# Altium PCB CH32X035C-R0.PcbDoc
Units mil, origin at the board's own origin, x right, y up, seen from the top; angles counter-clockwise.
Board outline 2401.57 x 2047.24 mil, 2 copper layers (Top Layer, Bottom Layer); 40 components, 62 nets, 228 pads, 251 vias.
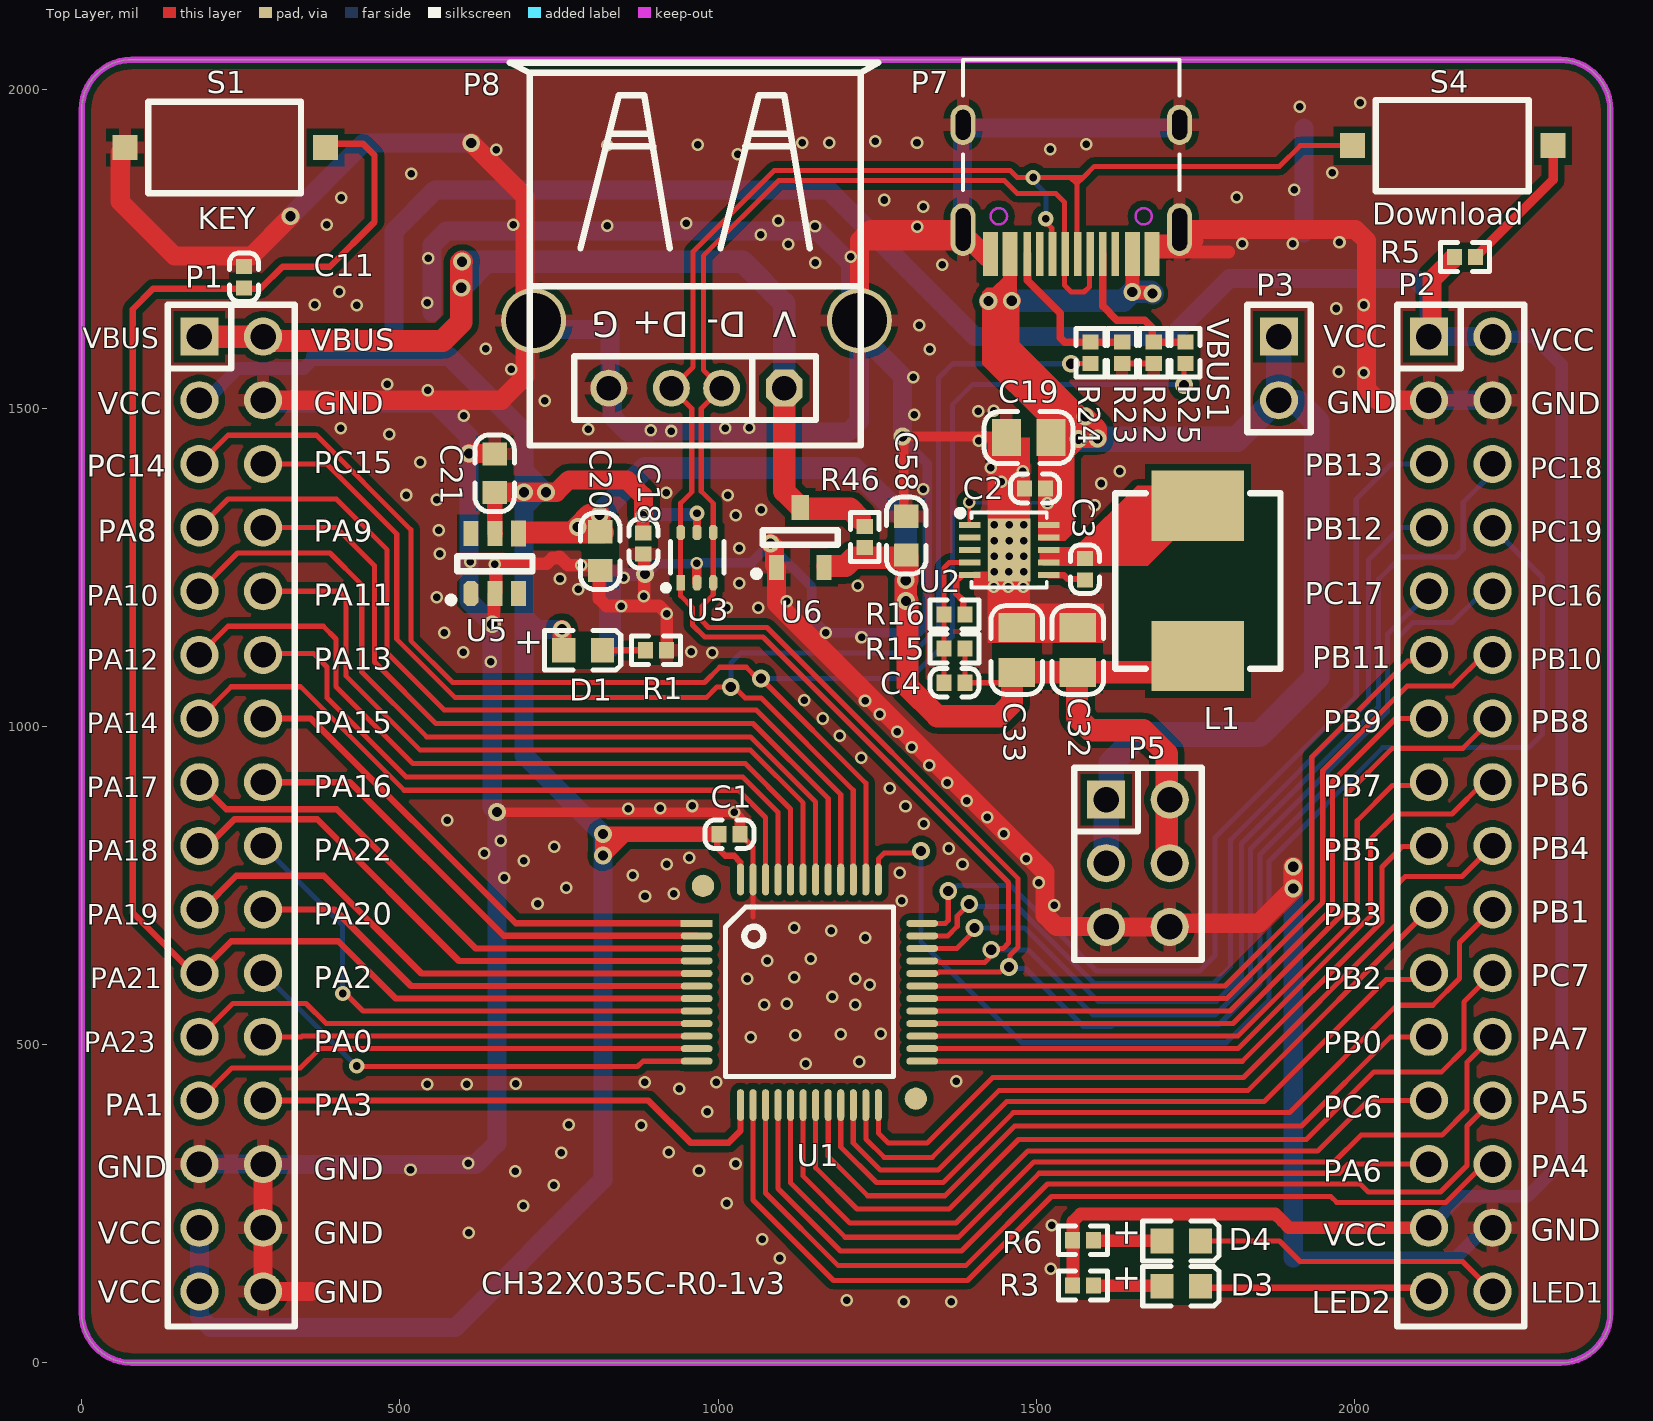
[diagram p0: Top Layer view]
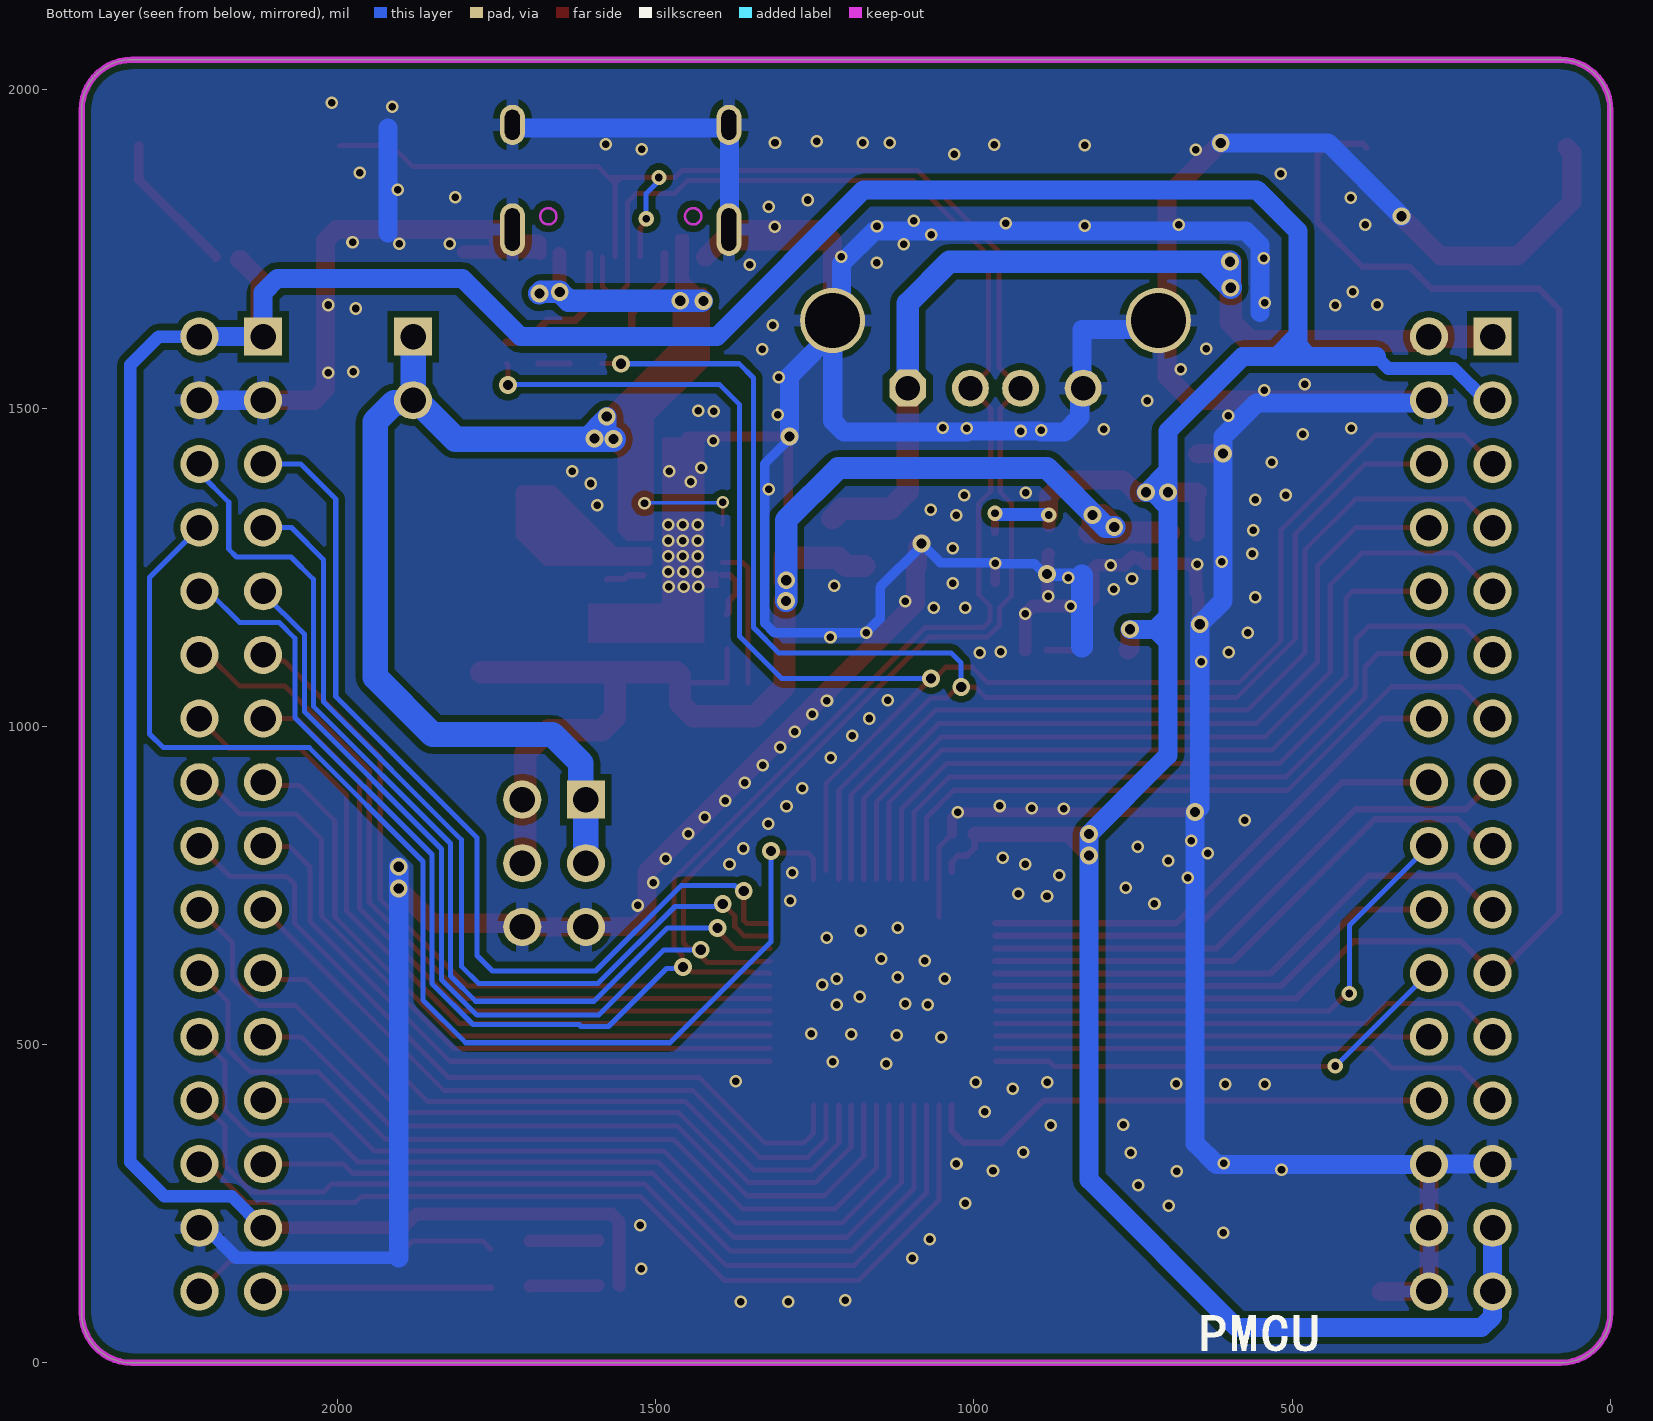
[diagram p1: Bottom Layer view, seen from below]

## Layer stack, top to bottom
Top Solder: solder mask 0.4, Solder Resist, Dk 3.5
Top Layer: signal copper 1.4
Dielectric1: dielectric 12.6, FR-4, Dk 4.8
Bottom Layer: signal copper 1.4
Bottom Solder: solder mask 0.4, Solder Resist, Dk 3.5

## Board outline
0,78.74 0,1968.5 cw(c78.74,1968.5) 78.74,2047.24 2322.84,2047.24 cw(c2322.84,1968.5) 2401.58,1968.5 2401.57,78.74 cw(c2322.83,78.74) 2322.84,0 78.74,0 cw(c78.74,78.74)

## Design rules (kind name [scope] priority, off if disabled: settings)
Clearance Clearance_1 [InPolygon] p1: gap=10 ignorepadtopadclearanceinfootprint=FALSE except(0: Arc-Hole Track-Hole SMDPad-Hole THPad-Hole Via-Hole Fill-Hole Poly-Hole Region-Hole Text-Hole)
Clearance [All] p2: gap=6 ignorepadtopadclearanceinfootprint=FALSE except(0: Arc-Hole Track-Hole SMDPad-Hole THPad-Hole Via-Hole Fill-Hole Poly-Hole Region-Hole Text-Hole)
ComponentClearance [All] p1 off: gap=10 collisioncheckmode=3 verticalgap=10 showdistances=FALSE
DiffPairsRouting [All] p1: maxlimit=10 minlimit=7 mostfreqgap=8 toplayer_minwidth=8 toplayer_maxwidth=15 toplayer_prefwidth=15 bottomlayer_minwidth=8 bottomlayer_maxwidth=15 bottomlayer_prefwidth=15 maxuncoupledlength=500
MinimumSolderMaskSliver [All] p1 off: minsoldermaskwidth=10
PolygonConnect PolygonConnect_1 [IsVia] p1: connectstyle=Direct reliefconductorwidth=10 reliefentries=4 polygonreliefangle="90 Angle" airgapwidth=10
PolygonConnect [All] p2: connectstyle=Relief reliefconductorwidth=20 reliefentries=4 polygonreliefangle="90 Angle" airgapwidth=10
RoutingVias [All] p1: holewidth=16 width=28 viastyle="Through Hole" minholewidth=11.81 minwidth=17.72 maxholewidth=20 maxwidth=32
SilkToSilkClearance [All] p1 off: silktosilkclearance=10
SilkToSolderMaskClearance [IsPad] p1 off: minsilkscreentomaskgap=10 clearancetoexposedcopper=TRUE
SolderMaskExpansion [All] p1: expansion=2 istentingtop=FALSE
Width [All] p1: maxlimit=100 minlimit=6 preferedwidth=10
25 further rules are at their usual default settings.

## Classes and differential pairs
differential pair NewDifferentialPair1: +PC16 -PC17

## Components (designator, comment, footprint, x,y, rotation, side; value= is the part's Value field where it differs from the comment)
C1 "0.1uF" 0402_C 1034.57,830.45 r270 top
C2 "NC(0.1uF)" 0402_C 1481.02,1373.79 r90 top
C3 "NC(100nF)" 0402_C 1576.2,1230.05 r180 top
C4 "NC(68pF)" 0402_C 1387.91,1068.48 r270 top
C11 "0.1uF" 0402_C 255,1722.24 r0 top
C18 "0.1uF" 0402_C 882.46,1270.58 r180 top
C19 "NC(22uF/35V)" 0805_C 1452.6,1453.61 r0 top
C20 "10uF" 0603_C 814.6,1244.87 r90 top
C21 "10uF" 0603_C 648.82,1427.95 r270 top
C32 "NC(22uF)" 0805_C 1564.9,1154.99 r270 top
C33 "NC(22uF)" 0805_C 1469.1,1154.99 r270 top
C58 "10uF" 0603_C 1295.47,1269.21 r90 top
D1 "RED" 0603+ 757.55,1119.65 r0 top
D3 "LED2" 0603+ 1697.11,120.47 r0 top
D4 "LED1" 0603+ 1697.11,191.47 r0 top
L1 "NC(4.7uH)" IND-SMD_L7.0-W6.6 1753.53,1228.43 r270 top
P1 "Header 16X2" IDC32-2.54mm 185,1612.24 r0 top
P2 "Header 16X2" IDC32-2.54mm 2116.58,1612.24 r0 top
P3 "HEADER 2" SIP2-2.54mm 1880.92,1612.24 r180 top
P5 "HEADER 3x2" IDC6-2.54mm 1609.43,884.87 r270 top
P7 "TYPE-C" TYPE-C-Receptacle-2.0 1554.72,1742.24 r180 top
P8 "USB_A" USBAF 1103.72,1531.24 r180 top
R1 "1K" 0402 885.61,1119.45 r0 top
R3 "1K" 0402 1556.4,121.6 r0 top
R5 "4.7K" 0402 2156.58,1737.24 r0 top
R6 "1K" 0402 1556.4,192.6 r0 top
R15 "NC(15K)" 0402 1354.45,1122.13 r0 top
R16 "NC(4.7K)" 0402 1387.91,1175.78 r180 top
R22 "5.1K" 0402 1684.41,1603.57 r270 top
R23 "5.1K" 0402 1634.59,1603.57 r270 top
R24 "0Ω" 0402 1584.78,1570.1 r90 top
R25 "0Ω" 0402 1734.23,1603.57 r270 top
R46 "NC(0Ω)" 0402 1230.25,1280.84 r90 top
S1 "KEY" SMD_6.1x3.65x2.5mm-KEY 383,1909.24 r180 top
S4 "Download" SMD_6.1x3.65x2.5mm-KEY 2311.58,1912.24 r180 top
U1 "CH32X035C8T6" LQFP48 966.15,690.45 r270 top
U2 "NC(CH2024Q)" DFN10_3X3 1457.18,1277.04 r270 top
U3 "CH412K" SOT-363 941.05,1225.61 r0 top
U5 "CH2003K" SOT-23-6 611.77,1208.49 r0 top
U6 "CH213" SOT-23-3 1091.55,1249.64 r0 top

## Footprints (in the part's own frame and the unit in brackets; to place one, negate y for a bottom-side part, rotate by r counter-clockwise, add the part's x,y. Pads: shape width x height; smd on the part's side, far side on the other; paste and mask are expansions set on the pad)
0402 [mm]
  rect 0.6x0.65 smd mask+0.051: 1(0,0) 2(0.85,0)
  silkscreen extent -0.55,-0.58 1.4,0.57
0402_C [mm]
  rect 0.65x0.6 smd mask+0.051: 1(0,0) 2(0,-0.85)
  silkscreen extent -0.58,-1.4 0.57,0.55
0603+ [mm]
  rect 0.93x0.98 smd: 1(0,0) 2(1.54,0)
  silkscreen extent -0.76,-0.79 2.27,0.79
0603_C [mm]
  rect 0.93x0.98 smd mask+0.051: 1(0,0) 2(1.54,0)
  silkscreen extent -0.76,-0.79 2.31,0.79
0805_C [mm]
  rect 1.16x1.47 smd mask+0.051: 1(0,0) 2(1.78,0)
  silkscreen extent -0.88,-1.04 2.66,1.03
DFN10_3X3 [mm]
  rect 2.5x1.7 smd mask+0.051: 0(0,0)
  rect 0.25x0.85 smd mask+0.051: 1(-1,-1.575) 2(-0.5,-1.575) 3(0,-1.575) 4(0.5,-1.575) 5(1,-1.575) 6(1,1.575) 7(0.5,1.575) 8(0,1.575) 9(-0.5,1.575) 10(-1,1.575)
  silkscreen extent -1.57,-2.05 1.5,1.5
IDC6-2.54mm [mil]
  rect 60x60 hole 40: 1(0,0)
  round 60 hole 40: 2(0,100) 3(100,0) 4(100,100) 5(200,0) 6(200,100)
  silkscreen extent -50,-50 252,150
IDC32-2.54mm [mil]
  rect 60x60 hole 40: 1(0,0)
  round 60 hole 40: 2(100,0) 3(0,-100) 4(100,-100) 5(0,-200) 6(100,-200) 7(0,-300) 8(100,-300) 9(0,-400) 10(100,-400) 11(0,-500) 12(100,-500) 13(0,-600) 14(100,-600) 15(0,-700) 16(100,-700) 17(0,-800) 18(100,-800) 19(0,-900) 20(100,-900) 21(0,-1000) 22(100,-1000) 23(0,-1100) 24(100,-1100) 25(0,-1200) 26(100,-1200) 27(0,-1300) 28(100,-1300) 29(0,-1400) 30(100,-1400) 31(0,-1500) 32(100,-1500)
  silkscreen extent -50,-1555 150,50
IND-SMD_L7.0-W6.6 [mm]
  rect 2.8x3.7 smd: 1(-3,0) 2(3,0)
  silkscreen extent -3.5,-3.3 3.5,3.3
LQFP48 [mm]
  round 0.889 smd: 0(-1.496,0.254) 0(6.996,8.746)
  rect 0.28x1.27 smd mask+0.051: 1(0,0)
  oval 0.28x1.27 smd mask+0.051: 2(0.5,0) 3(1,0) 4(1.5,0) 5(2,0) 6(2.5,0) 7(3,0) 8(3.5,0) 9(4,0) 10(4.5,0) 11(5,0) 12(5.5,0) 25(5.5,9) 26(5,9) 27(4.5,9) 28(4,9) 29(3.5,9) 30(3,9) 31(2.5,9) 32(2,9) 33(1.5,9) 34(1,9) 35(0.5,9) 36(0,9)
  oval 1.27x0.28 smd mask+0.051: 13(7.25,1.75) 14(7.25,2.25) 15(7.25,2.75) 16(7.25,3.25) 17(7.25,3.75) 18(7.25,4.25) 19(7.25,4.75) 20(7.25,5.25) 21(7.25,5.75) 22(7.25,6.25) 23(7.25,6.75) 24(7.25,7.25) 37(-1.75,7.25) 38(-1.75,6.75) 39(-1.75,6.25) 40(-1.75,5.75) 41(-1.75,5.25) 42(-1.75,4.75) 43(-1.75,4.25) 44(-1.75,3.75) 45(-1.75,3.25) 46(-1.75,2.75) 47(-1.75,2.25) 48(-1.75,1.75)
  silkscreen extent -0.65,1.15 6.11,7.86
SIP2-2.54mm [mil]
  rect 60x60 hole 40: 1(0,0)
  round 60 hole 40: 2(0,100)
  silkscreen extent -50,-50 50,150
SMD_6.1x3.65x2.5mm-KEY [mm]
  rect 1x1 smd: 1(0,0) 2(8,0)
  silkscreen extent 0.98,-1.83 7.08,1.83
SOT-23-3 [mm] "SOT-23-3"
  rect 0.6x1 smd: 1(0,0) 2(1.9,0)
  rect 0.7x1 smd: 3(0.95,2.4)
  silkscreen extent -0.93,-0.38 2.45,1.49
SOT-23-6 [mm] "SOT-23-6"
  oct 0.6x1 smd: 1(0,0)
  rect 0.6x1 smd: 2(0.95,0) 3(1.9,0) 5(0.95,2.4) 6(0,2.4)
  rect 0.6x1.04 smd: 4(1.9,2.4)
  silkscreen extent -0.93,-0.38 2.45,1.49
SOT-363 [mm]
  rect 0.35x0.6 smd mask+0.051: 1(0,0)
  oct 0.35x0.6 smd mask+0.051: 2(0.65,0) 3(1.3,0) 4(1.3,2) 5(0.65,2) 6(0,2)
  silkscreen extent -0.7,-0.31 1.73,1.65
TYPE-C-Receptacle-2.0 [mm]
  oval 1x2.1 hole 0.6 slot 1.7 at 90 deg: 0(-4.32,-0.97) 0(4.32,-0.97)
  oval 1x1.6 hole 0.6 slot 1.2 at 90 deg: 0(-4.32,-5.15) 0(4.32,-5.15)
  rect 0.6x1.75 smd mask+0.051: A1(-3.225,0) A4(-2.45,0) B1(3.225,0) B4(2.45,0)
  rect 0.3x1.75 smd mask+0.051: A5(-1.25,0) A6(-0.25,0) A7(0.25,0) A8(1.25,0) B5(1.75,0) B6(0.75,0) B7(-0.75,0) B8(-1.75,0)
  Keep-Out Layer circle w0.1: c2.89,-1.5 r0.325
  Keep-Out Layer circle w0.1: c-2.89,-1.5 r0.325
  silkscreen extent -4.32,-7.75 4.32,-2.55
USBAF [mm]
  round 2.6 hole 2.2: 0(-3,-2.7) 0(10,-2.7)
  oct 1.473x1.473 hole 0.965: 1(0,0)
  round 1.473 hole 0.965: 2(2.5,0) 3(4.5,0) 4(7,0)
  silkscreen extent -3.75,-12.99 10.95,2.29

## Part data
C1 C11 C18: library part Cap, "Capacitor"
C2 C20 C21 C58: library part CAP, "Capacitor"
C3: library part "0603 1uF (105) 10% 50V", "贴片电容", Package=0603, SuppliersPartNumber=C15849, ComponentLink1Description=供应商链接, ComponentLink1URL=http://www.szlcsc.com/product/details_16531.html, Supplier=LC
C4 C19 C32 C33: library part "0603 100nF (104) 10% 50V", "贴片电容", Package=0603, SuppliersPartNumber=C14663, ComponentLink1Description=供应商链接, ComponentLink1URL=http://www.szlcsc.com/product/details_15331.html, Supplier=LC
D1 D3 D4: library part LED0, "Typical INFRARED GaAs LED", LatestRevisionDate=08-Jul-2005, LatestRevisionNote="Mech Layer 1 removed.", PackageReference=LED-0, Published=8-Jun-2000, Publisher="Altium Limited"
  D1: PackageDescription="LED; 2 Leads"
L1: library part INDUCTOR
P1 P2: "Header, 16-Pin, Dual row", LatestRevisionDate=17-Jul-2002, LatestRevisionNote="Re-released for DXP Platform.", Publisher="Altium Limited"
P3: "Header, 2-Pin"
P5: "Header, 3-Pin, Dual row"
P7: library part TYPE-C1
P8: library part USB, "USB Port"
R1 R15 R16 R46: library part RES
R3 R6: library part "Res Semi", "Semiconductor Resistor"
R5 R22 R23 R24 R25: library part Res2, "Resistor"
S4: library part KEY1
U1: "RISC-V MCU with USB/PD/ADC/SPI/I2C/UART/OA/CMP"
U2: library part CH2024Q, "Step-Down DC-DC Converter, 28V input, FB 1.2V, 3A output"
U3: "Qaud ESD protect, high speed"
U5: "Step-Down DC-DC Converter, 5V input, FB 0.6V, 800mA output, with LDO 3.3V * 200mA"
U6: library part CH213E, "Ideal Diode 5V*1A"

## Via types
v1: diameter 19.68, hole 11.81, Top Layer to Bottom Layer, tented both sides, 207 vias
v2: diameter 28, hole 16, Top Layer to Bottom Layer, tented both sides, 38 vias
v3: diameter 24, hole 12, Top Layer to Bottom Layer, tented both sides, 6 vias

## Nets (pads, with @x,y where several pads share a name; then routed paths per layer and width w, separated by ;. In a path a pad name is that pad's centre, name@x,y a point inside that pad or via, vN(x,y) a via of type N, cw(c..) or ccw(c..) an arc to the next point about the centre after c; other vN are vias at no path point)
3V3: C1.2 C18.2 C21.2 D1.1 P1.3 P1.29 P1.31 P2.1 P2.2 P2.29 R3.1 R5.1 R6.1 U1.48 U3.5 U5.5 | length 8458.7
  Top Layer w10: C1.2@998.32,830.45 998.32,809.45 1011.32,796.45 1025.15,796.45 1034.85,786.75 1034.85,771.75 U1.48@1035.05,771.56
  Top Layer w13: U3.5 v3(966.64,1334.61)
  Top Layer w20: C18.2@881.69,1314.72 881.69,1331.28 v3(882.46,1332.04) ; R3.1 1557.58,122.78 1557.58,222.07 1569.3,233.79 1875.09,233.79 1886.26,222.62 1896.63,212.24 P2.29
  Top Layer w25: C21.2 648.99,1367.14 648.99,1303.16 U5.5 ; v2(818.79,830.92) v2(818.79,797.23) 819.6,797.23 852.82,830.45 ; v2@819.26,830.45 852.82,830.45 ; C1.2@997.69,830.45 852.82,830.45
  Top Layer w30: C21.2 649.2,1367.71 v2(695.08,1367.71) v2(729.59,1367.71) 745.74,1367.71 765.34,1387.31 856.6,1387.31 882.46,1361.46 v3(882.46,1332.04) ; v2(754.49,1152.43) 754.49,1122.71 D1.1 ; P2.1@2121.58,1601.68 2121.58,1702.24 2152.28,1732.95 R5.1@2153.27,1732.95
  Bottom Layer w20: P1.3 195.82,1512.24 245.81,1562.23 348.99,1562.23 367.61,1580.85 ; v3(882.46,1332.04) 883.22,1332.81 963.76,1332.81 965.56,1334.61 v3(966.64,1334.61) ; P2.29 2166.29,261.96 2271.9,261.96 2325.3,315.36 2325.3,1567.52 2280.58,1612.24 P2.2
  Bottom Layer w30: P1.29 P1.31 185,72.93 202.57,55.36 586.67,55.36 818.79,287.48 v2(818.79,797.23) v2(818.79,830.92) 695.08,954.63 695.08,1132.7 ; 367.61,1580.85 473.98,1580.85 ; 490.58,1614.42 490.58,1614.05 ; v2(729.59,1367.71) v2@728.41,1367.71 ; v2(754.49,1152.43) 714.81,1152.43 ; P2.2 P2.1 2116.58,1681.28 2094.11,1703.74 1803.53,1703.74 1712.03,1612.24 1403.72,1612.24 1173.42,1842.55 555.14,1842.55 490.58,1777.99 490.58,1614.05 ; 473.98,1580.85 490.58,1597.45 ; 473.98,1580.85 490.58,1580.85 ; 490.58,1580.85 523.79,1580.85 ; 490.58,1580.85 490.58,1597.45 ; 490.58,1597.45 490.58,1614.05 ; 490.58,1614.05 523.79,1580.85 ; 523.79,1580.85 577.87,1580.85 695.08,1463.64 695.08,1401.04 ; 695.08,1132.7 695.08,1151.84 ; 695.08,1132.7 714.81,1152.43 ; 695.08,1151.84 695.08,1172.16 ; 695.08,1151.84 695.67,1152.43 714.81,1152.43 ; 695.08,1172.16 695.08,1344.44 ; 695.08,1172.16 714.81,1152.43 ; 695.08,1344.44 v2@718.35,1367.71 ; 695.08,1344.44 v2(695.08,1367.71) ; v2(695.08,1367.71) v2@718.35,1367.71 ; v2(695.08,1367.71) 695.08,1401.04 ; 695.08,1401.04 v2@728.41,1367.71 ; v2@718.35,1367.71 v2@728.41,1367.71
+5V: C4.1 C20.2 C32.2 C33.2 C58.1 L1.2 P5.2 P5.4 R15.2 R46.1 U5.4 U6.2 | length 2347.8
  Top Layer w8: R15.2 C4.1 1452.92,1068.48 1461.71,1077.28 C33.2@1469.35,1084.91
  Top Layer w35: U5.4@693.29,1304.69 779.31,1304.69 C20.2@813.8,1304.69 ; v2(779.31,1313.31) 797.86,1331.86 v2(813.46,1331.86) 813.46,1306.31 814.27,1305.5 C20.2 C20.2@813.8,1304.69 ; C20.2@818.8,1304.69 C20.2@813.8,1304.69 ; U6.2@1171.86,1251.82 1200.09,1251.82 1213.3,1265.04 1296.16,1265.04 1297.26,1266.14 v2@1297.26,1229.55 ; v2(1294.79,1229.55) 1294.79,1197.22 v2(1295.21,1196.8) ; C58.1 C58.1@1296.46,1269.21 ; v2@1297.26,1197.22 1297.26,1062.86 1344.35,1015.77 1441.21,1015.77 1461.71,1036.28 1461.71,1077.28 1461.71,1079.57 1467.05,1084.91 C33.2 ; C33.2@1469.35,1084.91 C32.2@1563.86,1084.91 ; P5.4 1704.65,789.66 1704.65,957.09 1667.76,993.98 1584.37,993.98 1563.86,1014.49 C32.2@1563.86,1084.91 ; L1.2@1773.99,1084.91 C32.2 C32.2@1563.86,1084.91
  Bottom Layer w35: v2(779.31,1313.31) 792.68,1313.31 885.25,1405.88 1212.84,1405.88 1294.79,1323.93 v2(1294.79,1229.55) 1294.79,1197.22 v2(1295.21,1196.8)
CC1: P1.5 R25.2 U1.38 | length 2656.2
  Top Layer w8: P1.5 230,1457.24 368.89,1457.24 517.16,1308.97 517.16,1134.56 582.87,1068.86 978.4,1068.86 1002.37,1092.83 1044.18,1092.83 1061.9,1075.11 v2(1067.32,1075.11) 1231.9,910.52 U1.38@1231.9,773.35 ; v2(1732,1536.04) 1732,1567.88 R25.2
  Bottom Layer w8: v2(1067.32,1075.11) 1301.78,1075.11 1367.83,1141.16 1367.83,1505.35 1399.78,1537.3 1730.74,1537.3 v2(1732,1536.04)
CC2: P1.6 R24.1 U1.39 | length 2417.9
  Top Layer w8: P1.6 385,1412.24 495,1302.24 495,1136.93 586.87,1045.06 981.31,1045.06 997.9,1061.64 1025.26,1061.64 1042.15,1044.76 1067.11,1044.76 1212.21,899.66 U1.39 ; v2(1554.5,1569.62) 1554.74,1569.86 1584.53,1569.86 R24.1
  Bottom Layer w8: v2(1019.85,1061.64) 1019.85,1099.62 1035.59,1115.35 1306.42,1115.35 1346.25,1155.18 1346.25,1547.3 1368.57,1569.62 v2(1554.5,1569.62)
FB: C4.2 R15.1 R16.2 U2.4 | length 224.6
  Top Layer w8: C4.2 R16.2 1354.45,1248.83 1362.97,1257.35 U2.4
GND: C1.1 C2.1 C11.1 C18.1 C19.1 C20.1 C21.1 C32.1 C33.1 C58.2 P1.4 P1.27 P1.28 P1.30 P1.32 P2.3 P2.4 P2.30 P5.5 P5.6 P7.0 P7.A1 P7.B1 P8.0 P8.4 R1.2 R16.1 R22.2 R23.2 S1.2 U1.47 U2.0 U2.5 U3.2 U5.2 U6.1 | length 12718.1
  Top Layer w8: C1.1@1039.73,825.29 1054.73,810.29 U1.47 1054.73,700.87
  Top Layer w10: R16.1 1384.71,1178.98 1384.71,1197.72 1374.17,1208.25 1374.17,1228.64 1380.03,1234.5 1380.35,1234.5 1383.52,1237.67 U2.5 ; R23.2 R22.2
  Top Layer w15: v2(652.29,865.36) v1(1025.47,865.36) 1034.26,856.57 1034.26,830.76 C1.1 ; v1@966.05,1256.61 v1(966.35,1256.31) 966.35,1225.9 U3.2 ; C58.2 1291.82,1333.49 1291.82,1452.87 v2(1289.33,1455.35) 1450.85,1455.35 C19.1
  Top Layer w20: v2(644.97,1160.47) 644.97,1162.63 647.36,1165.02 647.36,1206.68 U5.2 650.98,1210.3 650.98,1243.92 662.7,1255.64 730.62,1255.64 739.51,1264.53 748.03,1264.53 749.84,1266.34 750.83,1266.34 763.99,1253.18 806.3,1253.18 C20.1 812.72,1242.98 812.72,1200.61 824.43,1188.9 880.94,1188.9 ; C18.1 883.76,1269.28 v2@883.76,1240.78 ; v2(885.06,1239.48) v2@883.76,1240.78 ; R1.2 919.17,1119.55 v1(919.17,1177.18) 907.46,1188.9 880.94,1188.9 ; P7.A1 P7.A1@1681.69,1743.27 ; 1752.11,1762.58 1683.5,1762.58 1681.69,1760.77 P7.A1@1681.69,1743.27 ; 1801.92,1745.08 1683.5,1745.08 P7.A1@1681.69,1743.27 ; 880.94,1188.9 883.76,1191.71 v2@883.76,1240.78
  Top Layer w30: S1.2 60.61,1901.82 60.61,1824.24 146.08,1738.77 266.38,1738.77 328.01,1800.4 v2(328.01,1801.28) ; P1.28 P1.30 ; P1.4 659.4,1512.24 696.18,1549.02 696.18,1623.7 710.02,1637.54 696.18,1651.39 696.18,1832.61 v2(612.17,1916.62) ; P1.30@290,207.24 P1.30 ; 360.25,112.24 P1.32 P1.30 ; v2(608.6,1428.4) 644.52,1428.4 644.97,1427.95 C21.1 ; v2(1082.23,1287.14) 1088.36,1281.01 1088.36,1252.82 U6.1 1091.55,1193.3 1513.69,771.16 1513.69,703.03 1531.27,685.46 1608.84,685.46 P5.5 P5.6 1715.17,690.61 1849.12,690.61 1903.38,744.88 v2(1903.38,745.18) v2(1903.38,779.46) ; P8.0@1221.83,1637.54 1221.83,1762.86 ; P7.0@1383.54,1775.43 P7.0@1384.65,1774.33 ; P7.B1@1421.73,1737.24 P7.0@1384.65,1774.33 ; P7.0@1724.8,1780.43 2001.07,1780.43 2018.65,1762.86 2018.65,1529.82 2036.22,1512.24 P2.3 ; 1221.83,1762.86 1380.32,1762.86 1384.65,1767.19 P7.0@1384.65,1774.33 ; 1221.83,1762.86 1239.41,1780.43 1384.65,1780.43 P7.0@1384.65,1774.33
  Bottom Layer w15: v2(885.06,1239.48) 888.58,1239.48 904.52,1255.42 965.45,1255.42 v1(966.35,1256.31) 967.25,1257.21 1052.3,1257.21 v2(1082.23,1287.14) 1082.23,1283.62 1147.11,1218.74 1147.11,1169.42 v1(1169.19,1147.35) 1313.66,1147.35 1328.38,1162.06 1328.38,1412.79 1289.33,1451.84 v2(1289.33,1455.35)
  Bottom Layer w20: 830.13,1236.54 831.54,1237.95 883.53,1237.95 v2(885.06,1239.48) ; 1903.38,165.22 2158.73,165.22 2205.75,212.24 P2.30
  Bottom Layer w30: P1.27 P1.28 P1.28@285.7,311.54 ; P1.4 289.31,1507.93 555.89,1507.93 608.6,1455.22 v2(608.6,1428.4) 608.6,1196.84 v2(644.97,1160.47) 644.97,872.68 v2(652.29,865.36) 652.29,345.02 618.82,311.54 P1.28@285.7,311.54 ; P1.28@290.71,306.54 P1.28@285.7,311.54 ; v2(328.01,1801.28) 443.35,1916.62 v2(612.17,1916.62) ; 550.65,1650.52 550.65,1756.09 572.49,1777.93 1156.75,1777.93 1207.99,1726.7 1207.99,1651.39 P8.0@1221.83,1637.54 ; P8.0@741.02,1623.54 829.84,1623.54 829.84,1532.95 P8.4 833.49,1525.89 833.49,1485.99 857.34,1462.14 894.11,1462.14 895.94,1463.96 1009,1463.96 1010.82,1462.14 1204.08,1462.14 1221.65,1479.71 1221.65,1637.36 P8.0@1221.83,1637.54 ; P8.0@1252.83,1623.54 P8.0@1221.83,1623.54 ; v2(1289.33,1455.35) 1289.33,1550.46 1221.83,1617.96 P8.0@1221.83,1623.54 ; P7.0@1383.54,1775.43 1383.54,1940 P7.0@1723.7,1940 ; 1903.38,165.22 v2(1903.38,745.18) v2(1903.38,779.46) ; 1920.55,1775.43 1920.55,1940 ; P2.3 P2.4 ; P8.0@1221.83,1623.54 P8.0@1221.83,1637.54
  Bottom Layer w35: 830.13,1125.39 830.13,1236.54
  other v1: 1291.72,95.9 1366.37,95.9 1202.14,98.03 1522.59,147.62 1096.57,164.14 1069.29,194.24 608.39,204.44 1523.66,216.4 693.81,247.16 1013.19,250.98 741.63,279.03 681.07,301.34 969.84,301.98 516.6,303.25 607.12,313.45 1027.21,312.82 753.74,330.03 922.51,330.93 879.05,372.95 765.21,374.01 982.73,394.2 938.49,430.34 542.75,437.69 604.96,437.89 682.32,438.84 884.31,440.75 997.05,440.93 1374.01,442.4 1137.23,469.59 1221.95,473.32 1051.23,511.24 1120.97,514.62 1192.74,515.98 1255.72,517.33 1072.62,562.38 1215.04,562.38 1107.79,564.49 1178.82,575.39 1238.11,593.85 1045.81,603.33 1215.09,603.33 1119.62,606.03 1077.42,631.93 1145.06,634.82 1231.34,667.65 1177.85,679.16 1119.62,683.23 1527.86,718.55 716.15,721.1 1288.35,725.99 885.01,732.93 930.17,736.73 761.1,746.75 1503.67,754.66 663.53,762.49 865.47,766.41 1285.5,769.68 919.44,783.16 1383.8,783.18 694.87,788.5 1484.17,792.2 954.4,793.89 632.2,800.92 1362.5,808.09 742.67,810.78 658.21,820.43 1448.43,831.56 1322.78,846.72 574.26,852.35 1422.93,857.18 858.94,870.28 909.06,871.07 1294.26,874.52 958.89,874.87 1390.24,883.45 1269.71,902.69 1360.12,911.65 1331.92,938.57 1224.95,950.98 1304.36,967.41 1190.64,984.89 1281.29,991.77 1164.31,1012.32 1253.73,1018.68 1230.66,1040.47 1135.52,1040.84 642.97,1101.71 990.84,1115.71 599.5,1116.38 957.48,1117.16 1225.16,1140.22 569.61,1146.82 1013.17,1185.99 1062.98,1185.99 847.91,1188.7 1107.35,1196.85 558.21,1203.1 882.77,1204.1 780.44,1215.42 1432.75,1219.25 1456.03,1219.25 1479.31,1219.25 1219.07,1220.61 1033.09,1224.44 751.46,1232.17 851.98,1233.53 1433.41,1243.06 1456.69,1243.06 1479.97,1243.06 785.14,1253.18 649.3,1254.99 610.28,1258.27 1433.67,1267 1456.95,1267 1480.24,1267 562.41,1271.39 1033.09,1279.55 1433.81,1291.47 1457.09,1291.47 1480.37,1291.47 561.21,1307.92 1433.67,1316.34 1456.96,1316.34 1480.24,1316.34 1027.3,1331.26 1067.51,1340.38 1591.39,1346.97 558.21,1355.84 510.06,1363.42 1015.18,1362.78 918.49,1367.26 1321.79,1372.61 1601.49,1381.5 1444.86,1384.5 1630.54,1400.44 1478.75,1400.95 1427.83,1406.13 531.69,1415.2 1409.03,1448.97 483.03,1458.94 926.34,1463.96 894.11,1464.99 796.17,1467.06 407.04,1468.23 1010.82,1468.27 1048.85,1468.92 600.57,1487.91 1307.84,1489.25 1408.57,1494.68 1432.58,1496.06 727.62,1511.54 543.71,1527.82 479.75,1537.66 1306.53,1548.26 2013.95,1555.6 1974.84,1557.43 675.12,1561.13 1332.1,1592.19 634.46,1592.87 1316,1629.89 1971.17,1656.42 366.03,1662.32 431.96,1661.83 2013.95,1661.92 543.19,1665.25 404.49,1682.8 1352.02,1725.44 1152.58,1728.07 544.7,1735.54 1207.95,1737.94 1109.72,1757.63 1823.3,1757.85 1902.73,1757.85 1976.06,1760.3 1066.87,1772.4 1152.09,1785.7 1313.06,1784.98 825.85,1786.25 385.01,1788.19 678.24,1787.75 949.86,1790.26 1094.45,1794.08 1321.88,1816.59 1260.87,1826.88 407.99,1830.15 1814.38,1831.16 1904.66,1842.78 517.96,1868.09 1964.55,1869.6 1030.8,1898.92 651.59,1905.99 1521.72,1906.45 825.47,1913.05 967.58,1914.03 1578.07,1914.5 1132.23,1916.56 1174.13,1916.56 1312.32,1916.56 1246.9,1919.5 1913.6,1973.29 2008.35,1979.55
LED1: D4.2 P2.32 | length 496.4
  Top Layer w8: D4.2@1758.41,178.27 1771.61,191.47 1881.83,191.47 1913.96,159.34 2169.48,159.34 P2.32
LED2: D3.2 P2.31 | length 361.3
  Top Layer w10: D3.2@1757.74,118.07 2110.75,118.07 P2.31
NetC3_1: C3.1 U2.6 | length 60.2
  Top Layer w10: U2.6 1519.27,1237.59 1543.21,1237.59 1549.29,1231.51 1574.74,1231.51 C3.1
NetC3_2: C3.2 L1.1 U2.7 U2.8
NetD1_2: D1.2 R1.1 | length 67.5
  Top Layer w10: D1.2 818.38,1119.45 R1.1
NetD3_1: D3.1 R3.2 | length 107.7
  Top Layer w20: R3.2 1590.43,121.04 1696.54,121.04 D3.1
NetD4_1: D4.1 R6.2 | length 107.7
  Top Layer w20: R6.2 1590.43,192.04 1696.54,192.04 D4.1
NetP7_A5: P7.A5 R22.1 R25.1 | length 247.5
  Top Layer w12: P7.A5 1603.94,1660.41 1626.48,1637.86 1670.27,1637.86 1681.78,1626.35 1681.78,1606.2 R22.1 R25.1
NetP7_B5: P7.B5 R23.1 R24.2 | length 253.1
  Top Layer w12: P7.B5 1485.83,1700.68 1537.49,1649.02 1537.49,1610.6 1544.52,1603.57 R23.1
NetR5_2: R5.2 S4.1 | length 226.5
  Top Layer w15: R5.2@2189.79,1736.87 2189.79,1737.98 2194.35,1742.54 2195.46,1742.54 2311.58,1858.65 S4.1
PA0: P1.24 U1.10 | length 681.6
  Top Layer w8: P1.24 345,512.24 346.04,513.29 U1.10
PA1: P1.25 U1.11 | length 814.9
  Top Layer w8: P1.25 235.89,463.13 343.41,463.13 373.88,493.6 U1.11
PA2: P1.22 U1.12 | length 745.5
  Top Layer w8: v3(432,466.35) 432.9,465.45 873.32,465.45 881.78,473.92 U1.12
  Bottom Layer w8: P1.22 285.55,612.24 431.44,466.35 v3(432,466.35)
PA3: P1.26 U1.13 | length 825.6
  Top Layer w10: P1.26 890.34,412.24 956.5,346.09 1016.69,346.09 1035.05,364.45 U1.13
PA4: P2.28 U1.14 | length 1451.6
  Top Layer w8: U1.14 1054.73,255.81 1180.97,129.57 1391.59,129.57 1523.46,261.44 1962.4,261.44 1971.59,252.24 2143.31,252.24 2203.31,312.24 P2.28
  Bottom Layer w8: P2.28 P2.28@2221.58,312.24
PA5: P2.26 U1.15 | length 1481.9
  Top Layer w8: U1.15 1074.42,266.88 1188.57,152.73 1388.91,152.73 1517.21,281.03 2008.73,281.03 2021.4,268.37 2134.75,268.37 2176.58,310.19 2176.58,372.24 P2.26
PA6: P2.27 U1.16 | length 1250.6
  Top Layer w8: U1.16 1094.1,274.02 1192.23,175.89 1382.33,175.89 1504.39,297.95 1976.01,297.95 1990.3,312.24 P2.27
PA7: P2.24 U1.17 | length 1434.7
  Top Layer w8: U1.17 1113.79,282.98 1199.44,197.33 1377.65,197.33 1495.82,315.5 1967.53,315.5 2010.1,358.06 2137.39,358.06 2176.58,397.24 2176.58,472.24 P2.24
PA8: P1.7 U1.40 | length 1447
  Top Layer w8: P1.7 230,1357.24 400,1357.24 480,1277.24 480,1115.1 569.56,1025.55 1059.9,1025.55 1192.53,892.92 U1.40
PA9: P1.8 U1.41 | length 1279.9
  Top Layer w8: P1.8 400,1312.24 460,1252.24 460,1100.99 556.44,1004.55 1054.76,1004.55 1172.84,886.46 U1.41
PA10: P1.9 U1.42 | length 1356.9
  Top Layer w8: P1.9 245,1272.24 390,1272.24 440,1222.24 440,1085.49 541.94,983.55 1050.76,983.55 1153.16,881.14 U1.42
PA11: P1.10 U1.43 | length 1178.6
  Top Layer w8: P1.10 405,1212.24 415,1202.24 415,1079.32 531.78,962.55 1050.76,962.55 1133.47,879.83 U1.43
PA12: P1.11 U1.44 | length 1221.2
  Top Layer w8: P1.11 230,1157.24 379.56,1157.24 399.48,1137.32 399.48,1062.29 520.23,941.55 1042.56,941.55 1113.79,870.31 U1.44
PA13: P1.12 U1.45 | length 1047.2
  Top Layer w8: P1.12 287,1114.24 364.5,1114.24 385.48,1093.26 385.48,1044.98 509.92,920.55 1038.76,920.55 1094.1,865.2 U1.45
PA14: P1.13 U1.46 | length 1092.7
  Top Layer w8: P1.13 235,1062.24 344.08,1062.24 506.78,899.55 1031.76,899.55 1074.42,856.88 U1.46
PA15: P1.14 U1.1 | length 814.4
  Top Layer w10: P1.14 360.15,1012.24 681.95,690.45 U1.1
PA16: P1.16 U1.2 | length 781.2
  Top Layer w10: P1.16 421.55,912.24 663.03,670.77 U1.2
PA17: P1.15 U1.3 | length 889.3
  Top Layer w10: P1.15 227.41,869.83 400.5,869.83 619.25,651.08 U1.3
PA18: P1.17 U1.4 | length 890.5
  Top Layer w10: P1.17 198.53,812.24 240.12,853.83 370.38,853.83 592.81,631.4 U1.4
PA19: P1.19 U1.5 | length 866.8
  Top Layer w10: P1.19 190,712.24 243.13,765.37 380.18,765.37 533.84,611.71 U1.5
PA20: P1.20 U1.6 | length 730.9
  Top Layer w10: P1.20 397.25,712.24 517.46,592.03 U1.6
PA21: C11.2 P1.21 S1.1 U1.7 | length 2564.3
  Top Layer w10: S1.1 389,1915.24 442,1915.24 460,1897.24 460,1792.24 390,1722.24 315.63,1722.24 280.63,1687.24 112,1687.24 80,1655.24 80,707.24 180,607.24 P1.21 235,662.24 403.35,662.24 493.25,572.34 U1.7
PA22: P1.18 U1.8 | length 851.3
  Top Layer w8: v3(410.06,580.31) 414.39,580.31 442.05,552.66 U1.8
  Bottom Layer w8: P1.18 410.06,687.18 v3(410.06,580.31)
PA23: P1.23 U1.9 | length 816.1
  Top Layer w8: P1.23 237.5,564.74 352.5,564.74 384.27,532.97 U1.9
PB0: P2.23 U1.20 | length 1153.4
  Top Layer w8: U1.20 1172.84,324.47 1234.79,262.53 1356.35,262.53 1465.94,372.12 1916.45,372.12 2056.58,512.24 P2.23
PB1: P2.20 U1.21 | length 1328.9
  Top Layer w8: U1.21 1192.53,339.24 1248.54,283.23 1353.48,283.23 1463.37,393.12 1897.45,393.12 2066.14,561.81 2122.71,561.81 2164.67,603.77 2164.67,660.34 P2.20 P2.20@2221.58,712.24
PB2: P2.21 U1.22 | length 1109.8
  Top Layer w8: U1.22 1212.21,345.56 1255.06,302.71 1345.2,302.71 1452.85,410.36 1857.65,410.36 2049.59,602.29 2106.63,602.29 P2.21
PB3: P2.19 U1.23 | length 1111.1
  Top Layer w8: U1.23 1231.9,351.87 1260.82,322.95 1336.28,322.95 1440.93,427.6 1831.93,427.6 P2.19
PB4: P2.18 U1.24 | length 1244.9
  Top Layer w8: U1.24 1251.58,361.19 1267.32,345.45 1328.3,345.45 1431.34,448.49 1825.36,448.49 2067.36,690.49 2067.36,752.15 2079.19,763.98 2168.48,763.98 2216.58,812.08 P2.18
PB5: P2.17 U1.25 | length 986.5
  Top Layer w8: U1.25 1823.41,473.92 2042.75,693.26 2042.75,779.14 2075.06,811.46 2115.79,811.46 P2.17
PB6: P2.16 U1.26 | length 1140.4
  Top Layer w8: U1.26 1816.5,493.6 2024.5,701.6 2024.5,822.7 2064.27,862.47 2152.73,862.47 2202.5,912.24 P2.16
PB7: P2.15 U1.27 | length 1049.8
  Top Layer w8: U1.27 1816.35,513.29 2003.94,700.87 2003.94,851.86 2059.08,907 2111.33,907 P2.15
PB8: P2.14 U1.28 | length 1201.4
  Top Layer w8: U1.28 1808.66,532.97 1985.46,709.77 1985.46,892.1 2058.86,965.5 2169.83,965.5 P2.14
PB9: P2.13 U1.29 | length 1103.4
  Top Layer w8: U1.29 1803.97,552.66 1965.18,713.87 1965.18,913.47 2063.95,1012.24 P2.13
PB10: P2.12 U1.30 | length 1241.3
  Top Layer w8: U1.30 1798.89,572.34 1949.81,723.26 1949.81,930.72 2082.23,1063.14 2153.4,1063.14 2202.5,1112.24 P2.12
PB11: P2.11 U1.31 | length 1142.5
  Top Layer w8: U1.31 1796.08,592.03 1932.55,728.5 1932.55,952.01 2082.98,1102.44 2106.77,1102.44 P2.11
PB12: P2.7 U1.35 | length 1421.8
  Top Layer w8: U1.35 1360.64,670.77 1375.62,685.75 1375.62,701.94 v2(1394.43,720.75)
  Bottom Layer w8: v2(1394.43,720.75) 1398.26,716.92 1469.6,716.92 1590.31,596.2 1778.24,596.2 1805.05,623.02 1805.05,822.03 2021.61,1038.59 2021.61,1261.83 2072.03,1312.24 P2.7
PB13: P2.5 U1.36 | length 1523.5
  Top Layer w8: U1.36 1356.68,690.45 1361.37,695.14 v2(1361.37,741.34)
  Bottom Layer w8: v2(1361.37,741.34) 1366.78,741.34 1375.18,749.74 1459.93,749.74 1594.16,615.51 1756.06,615.51 1780.49,639.94 1780.49,824.98 2002.35,1046.83 2002.35,1357.14 2057.46,1412.24 P2.5
PC6: P2.25 U1.18 | length 1204.9
  Top Layer w8: U1.18 1133.47,293.3 1206.86,219.91 1373.59,219.91 1486.45,332.78 1941.8,332.78 2021.27,412.24 P2.25
PC7: P2.22 U1.19 | length 1386
  Top Layer w8: U1.19 1153.16,306.61 1217.94,241.83 1362.91,241.83 1471.84,350.76 1923.82,350.76 2030.3,457.24 2136.58,457.24 2171.58,492.24 2171.58,567.24 P2.22
PC16: P2.10 P7.A7 P7.B7 P8.2 U1.32 U3.3 U3.4 | length 3691.2
  Top Layer w8: U1.32 1321.06,612.29 1345.63,612.29 1347.39,614.06 1443.14,614.06 1453.27,624.19 1458.68,624.19 1458.68,640.9 1471.21,653.43 1471.21,760.69 1076.6,1155.31 984.96,1155.31 974.78,1165.49 974.78,1189.35 992.24,1206.8 U3.4 992.24,1350.38 973.43,1369.19 973.43,1499.37 P8.2 976.68,1559.87 976.68,1739.2 1094.72,1857.24 1449.72,1857.24 1469.72,1837.24 1530.35,1837.24 1543.78,1823.82 1543.78,1693.19 1554.72,1682.24 1574.72,1682.24 1583.15,1690.67 P7.B7@1583.15,1737.24
  Bottom Layer w8: v2(1456.65,622.16) 1459.22,619.58 1482.73,619.58 1573.89,528.42 1617.12,528.42 1620.2,531.5 1786.95,531.5 1851.2,595.75 1851.2,798.57 2066.63,1014 2066.63,1138.56 2091.06,1162.99 2153.25,1162.99 2202.5,1212.24 P2.10
PC17: P2.9 P7.A6 P7.B6 P8.3 S4.2 U1.33 U3.1 U3.6 | length 4132.2
  Top Layer w8: U1.33 1321.06,630.82 1345.63,630.82 1347.39,629.06 1418.85,629.06 1425.29,635.49 1425.29,645.11 1431.3,651.12 1447.7,651.12 1456.21,659.64 1456.21,754.48 1070.38,1140.31 978.75,1140.31 959.78,1159.28 959.78,1186.31 941.05,1205.03 U3.6 941.05,1350.49 958.43,1367.87 958.43,1499.37 P8.3 927.48,1531.24 960.68,1564.44 960.68,1745.82 1088.1,1873.24 1458.72,1873.24 1469.72,1862.24 v3(1494.72,1862.24) 1553.46,1862.24 ; v3@1514.72,1792.24 1524.09,1782.87 P7.B6@1524.09,1737.24 ; P7.A6@1563.46,1737.24 1563.46,1852.24 ; S4.2 1914.34,1912.24 1881.81,1879.71 1590.93,1879.71 1573.46,1862.24 ; 1553.46,1862.24 1573.46,1862.24 ; 1553.46,1862.24 1563.46,1852.24 ; 1563.46,1852.24 1573.46,1862.24
  Bottom Layer w8: v2(1429.11,648.94) 1486.61,648.94 1589.05,546.5 1780.74,546.5 1836.2,601.96 1836.2,807.49 2051.63,1022.92 2051.63,1144.77 2084.85,1177.99 2085.7,1177.99 2116.58,1208.86 P2.9 ; v3@1494.72,1857.24 1514.72,1837.24 v3(1514.72,1797.24) v3@1514.72,1792.24
PC18: P2.6 U1.34 | length 1599.7
  Top Layer w8: U1.34 1374.9,651.08 1402.55,678.74 v2(1402.55,683.19)
  Bottom Layer w8: v2(1402.55,683.19) 1481.45,683.19 1596.57,568.07 1782.51,568.07 1822.2,607.76 1822.2,816.12 2037.63,1031.55 2037.63,1231.03 2072.66,1266.06 2158.26,1266.06 2170.54,1278.34 2170.54,1352.14 2216.58,1398.17 P2.6
PC19: P2.8 U1.37 | length 1973.8
  Top Layer w8: U1.37 1251.58,791.72 1260.9,801.04 1315.8,801.04 v2(1318.72,803.96)
  Bottom Layer w8: v2(1318.72,803.96) 1318.72,661.66 1477.48,502.9 1798.29,502.9 1865.2,569.81 1865.2,787.66 2043.99,966.44 2273.12,966.44 2294.81,988.14 2294.81,1234.01 P2.8
VBUS: P1.1 P1.2 P8.1 R46.2 U6.3 | length 1586
  Top Layer w35: P1.1 P1.2 289.78,1607.46 307.46,1607.46 309.68,1605.24 566.78,1605.24 596.48,1634.95 v2(596.48,1689.1) 596.48,1728.83 v2(597.67,1730.02) ; P8.1 1103.72,1369.35 U6.3 1131.14,1341.94 1206.93,1341.94 1222.2,1326.66
  Bottom Layer w35: P8.1 1103.72,1664.56 1038.26,1730.02 637.2,1730.02 ; v2@597.67,1690.48 596.48,1689.29 v2(596.48,1689.1) 597.67,1690.29 v2@597.67,1690.48 ; v2@597.67,1690.48 v2(597.67,1730.02) 637.2,1730.02 ; v2@597.67,1690.48 637.2,1730.02
VBUS1: C2.2 C19.2 P3.1 P3.2 P5.1 P5.3 P7.A4 P7.B4 U2.1 U2.9 U2.10 | length 2941.2
  Top Layer w6: v1(1394.53,1351.89) 1394.53,1317.05 U2.1
  Top Layer w18: 1442.3,1675.62 1455.46,1688.78 ; P7.B4 1458.27,1681.69 1459.17,1680.79 1459.17,1670.65 v2(1461.08,1668.73)
  Top Layer w22: P7.A4 1650.81,1741.87 1650.81,1682.94 v2(1650.43,1682.57) 1651.58,1681.42 1679.5,1681.42 1680.88,1680.04 v2(1682.5,1680.04)
  Top Layer w30: v2@1458.27,1665.92 1458.27,1634.7 ; v2(1461.08,1668.73) 1442.79,1668.73 1442.3,1668.24 v2(1424.72,1668.24) 1458.27,1634.7 ; C19.2@1524.42,1455.34 C19.2@1526.15,1453.61 ; 1526.15,1308.72 C19.2@1526.15,1452.01 ; v2(1566.24,1451.29) v2@1562.32,1451.29 ; 1458.27,1634.7 1458.27,1567.23 1519.58,1505.92 ; 1519.58,1505.92 1538.69,1486.82 ; 1519.58,1505.92 1519.58,1456.7 C19.2 1524.28,1452.01 C19.2@1526.15,1452.01 ; C19.2@1526.15,1452.01 C19.2@1526.15,1453.61 ; C19.2@1526.15,1452.01 C19.2@1527.75,1452.01 ; C19.2@1526.15,1453.61 C19.2@1527.75,1452.01 ; C19.2@1527.75,1452.01 1548.07,1452.01 ; C19.2@1527.75,1452.01 1528.47,1451.29 1547.35,1451.29 ; 1538.69,1486.82 1560.78,1464.72 ; 1538.69,1486.82 v2(1576.56,1486.82) ; 1547.35,1451.29 1548.07,1452.01 ; 1547.35,1451.29 v2@1562.32,1451.29 ; 1548.07,1452.01 1560.78,1464.72 ; 1548.07,1452.01 v2@1562.32,1452.01 ; 1560.78,1464.72 1562.32,1463.18 v2@1562.32,1452.01 ; 1560.78,1464.72 1576.56,1480.49 v2(1576.56,1486.82) ; v2@1562.32,1451.29 v2@1562.32,1452.01 ; v2@1562.32,1452.01 v2(1596.05,1452.01) 1596.05,1467.32 v2(1576.56,1486.82)
  Bottom Layer w6: v1(1394.53,1351.89) 1395.29,1351.13 1516.59,1351.13 v1(1517.36,1350.37)
  Bottom Layer w18: v2(1424.72,1668.24) v2@1427.43,1668.24
  Bottom Layer w30: v2(1566.24,1451.29) 1576.56,1461.61 v2(1576.56,1486.82) 1612.09,1451.29
  Bottom Layer w35: v2@1427.43,1668.24 1427.92,1668.73 v2(1461.08,1668.73) 1548.84,1668.73 1636.6,1668.73 v2(1650.43,1682.57) 1679.97,1682.57 v2(1682.5,1680.04)
  Bottom Layer w40: v2(1566.24,1451.29) 1612.09,1451.29 1814.55,1451.29 1875.51,1512.24 P3.2 ; P5.3 P5.1 1617.32,892.76 1617.32,942.41 1662.1,987.2 1850.37,987.2 1940.43,1077.26 1940.43,1478.81 1910.83,1508.42 1884.75,1508.42 P3.2 ; P3.1 P3.2
pads on no net: P7.A8 P7.B8 U1.0 U2.2 U2.3 U5.1 U5.3 U5.6

## Polygon pours and split planes (outlines as drawn)
GND on Bottom Layer "GND" (solid, remove dead copper, pour order 1): 0,78.74 0,1968.5 cw(c78.74,1968.5) 78.74,2047.24 2322.84,2047.24 cw(c2322.84,1968.5) 2401.58,1968.5 2401.57,78.74 cw(c2322.83,78.74) 2322.84,0 78.74,0 cw(c78.74,78.74)
GND on Top Layer "GND" (solid, remove dead copper, pour order 0): 0,78.74 0,1968.5 cw(c78.74,1968.5) 78.74,2047.24 2322.84,2047.24 cw(c2322.84,1968.5) 2401.58,1968.5 2401.57,78.74 cw(c2322.83,78.74) 2322.84,0 78.74,0 cw(c78.74,78.74)

## Keep-outs
Keep-Out Layer:
  the board outline again, w10

## Other copper
Top Layer:
  rectangle net GND: 1423.27,1130.55 1605.8,1193
  rectangle net GND: 1401.18,1217.18 1471.19,1242.91
  rectangle net GND: 1423.14,1151.69 1489.86,1453.61
  pour cut-out: 1625.51,1099.8 1625.51,1366.94 1881.12,1366.94 1881.12,1090.3
  region net NetC3_2: 1509.87,1252.61 1674.9,1252.61 1719.58,1297.29 1719.58,1371.88 1713.11,1378.35 1658.47,1378.35 1561.21,1281.09 1508.36,1281.09 1504.88,1277.61 1504.88,1255.76
  region net VBUS1: 1447.54,1766.68 1447.54,1704.69 1431.61,1688.76 1421.54,1688.76 1414.94,1682.17 1414.94,1569.21 1502.75,1481.4 1502.75,1293.92 1505.23,1291.45 1545.25,1291.45 1559.31,1305.51 1559.31,1424.84 1576.74,1442.27 1576.74,1499.99 1469.06,1607.67 1469.06,1769.58 1465.69,1772.95 1448.88,1772.95
  pour cut-out: 1372.7,1154.09 1406.94,1154.09 1410,1157.14 1410,1197.82 1401.18,1206.64 1401.18,1242.91 1396.77,1247.32 1369.99,1247.32 1367.28,1244.61 1367.28,1158.5

## Silkscreen, mask and mechanical layers (free items; w line width, h text height)
Top Overlay:
  text "VBUS1" at 1768.26,1641.29 h35 r270
  text "VCC" at 1950.73,1595.24 h35
  text "VBUS" at 2.01,1594.24 h32
  text "VBUS" at 360,1590.24 h35
  text "VCC" at 2276.58,1590.24 h35
  text "GND" at 1956.13,1491.61 h35
  text "VCC" at 25,1490.04 h35
  text "GND" at 365,1490.04 h35
  text "GND" at 2276.58,1490.38 h35
  text "PC15" at 365,1397.24 h35
  text "PB13" at 1921.58,1393.6 h35
  text "PC14" at 8,1392.24 h35
  text "PC18" at 2275.58,1389.51 h32
  text "PB12" at 1921.58,1292.78 h35
  text "PA8" at 25,1289.64 h35
  text "PA9" at 365,1289.64 h35
  text "PC19" at 2275.58,1289.64 h32
  text "PC17" at 1921.58,1191.96 h35
  text "PC16" at 2275.58,1189.78 h32
  text "PA10" at 8.34,1189.44 h32
  text "PA11" at 365,1189.44 h35
  text "PB11" at 1933.24,1091.14 h35
  text "PB10" at 2275.58,1089.91 h32
  text "PA12" at 8.34,1089.24 h32
  text "PA13" at 365,1089.24 h35
  text "PB8" at 2276.58,991.04 h35
  text "PB9" at 1950.73,990.32 h35
  text "PA14" at 8.34,989.04 h32
  text "PA15" at 365,989.04 h35
  text "PB6" at 2276.58,891.18 h35
  text "PA17" at 8.34,888.84 h32
  text "PA16" at 365,888.84 h35
  text "PB7" at 1950.73,889.5 h35
  text "PB4" at 2276.58,791.31 h35
  text "PA18" at 8.34,788.64 h32
  text "PA22" at 365,788.64 h35
  text "PB5" at 1950.73,788.68 h35
  text "PB1" at 2276.58,691.44 h35
  text "PA19" at 8.34,688.44 h32
  text "PA20" at 365,688.44 h35
  text "PB3" at 1950.73,687.86 h35
  text "PC7" at 2276.58,591.58 h35
  text "PA21" at 13.67,588.24 h32
  text "PA2" at 365,588.24 h35
  text "PB2" at 1950.73,587.04 h35
  text "PA7" at 2276.58,491.71 h35
  text "PA23" at 3.01,488.04 h32
  text "PA0" at 365,488.04 h35
  text "PB0" at 1950.73,486.22 h35
  text "PA5" at 2276.58,391.84 h35
  text "PA1" at 36.66,387.84 h35
  text "PA3" at 365,387.84 h35
  text "PC6" at 1950.73,385.4 h35
  text "PA4" at 2276.58,291.98 h35
  text "GND" at 24.56,290.61 h35
  text "GND" at 365,287.64 h35
  text "PA6" at 1950.73,284.58 h35
  text "GND" at 2276.58,192.11 h35
  text "VCC" at 25,187.44 h35
  text "GND" at 365,187.44 h35
  text "VCC" at 1950.73,183.76 h35
  text "CH32X035C-R0-1v3" at 627.95,107.48 h35
  text "VCC" at 25,94.24 h35
  text "GND" at 365,94.24 h35
  text "LED1" at 2276.58,94.24 h32
  text "LED2" at 1932.58,78.24 h35
Bottom Overlay:
  drawing of 869 lines, arcs and shapes, not listed
Mechanical 1:
  the board outline again, w10

## Text inside footprints (layer, text, board x,y; h text height)
D1: Top Overlay "+" at 719.48,1108.66 h40 r90
D3: Top Overlay "+" at 1659.03,109.48 h40 r90
D4: Top Overlay "+" at 1659.03,180.48 h40 r90
P8: Top Overlay "G" at 843.72,1651.24 h40 r180; Top Overlay "V" at 1123.72,1651.24 h40 r180; Top Overlay "D+" at 953.72,1651.24 h40 r180; Top Overlay "D-" at 1043.72,1651.24 h40 r180